# Altium PCB MiniDisplay.PcbDoc (part 2 of 2)
Units mil, origin at the board's own origin, x right, y up, seen from the top; angles counter-clockwise.
Board outline 1645.04 x 1210.04 mil, 2 copper layers (Top1, Bottom2), stack 42.17 mil thick; 71 components, 72 nets, 363 pads, 233 vias.
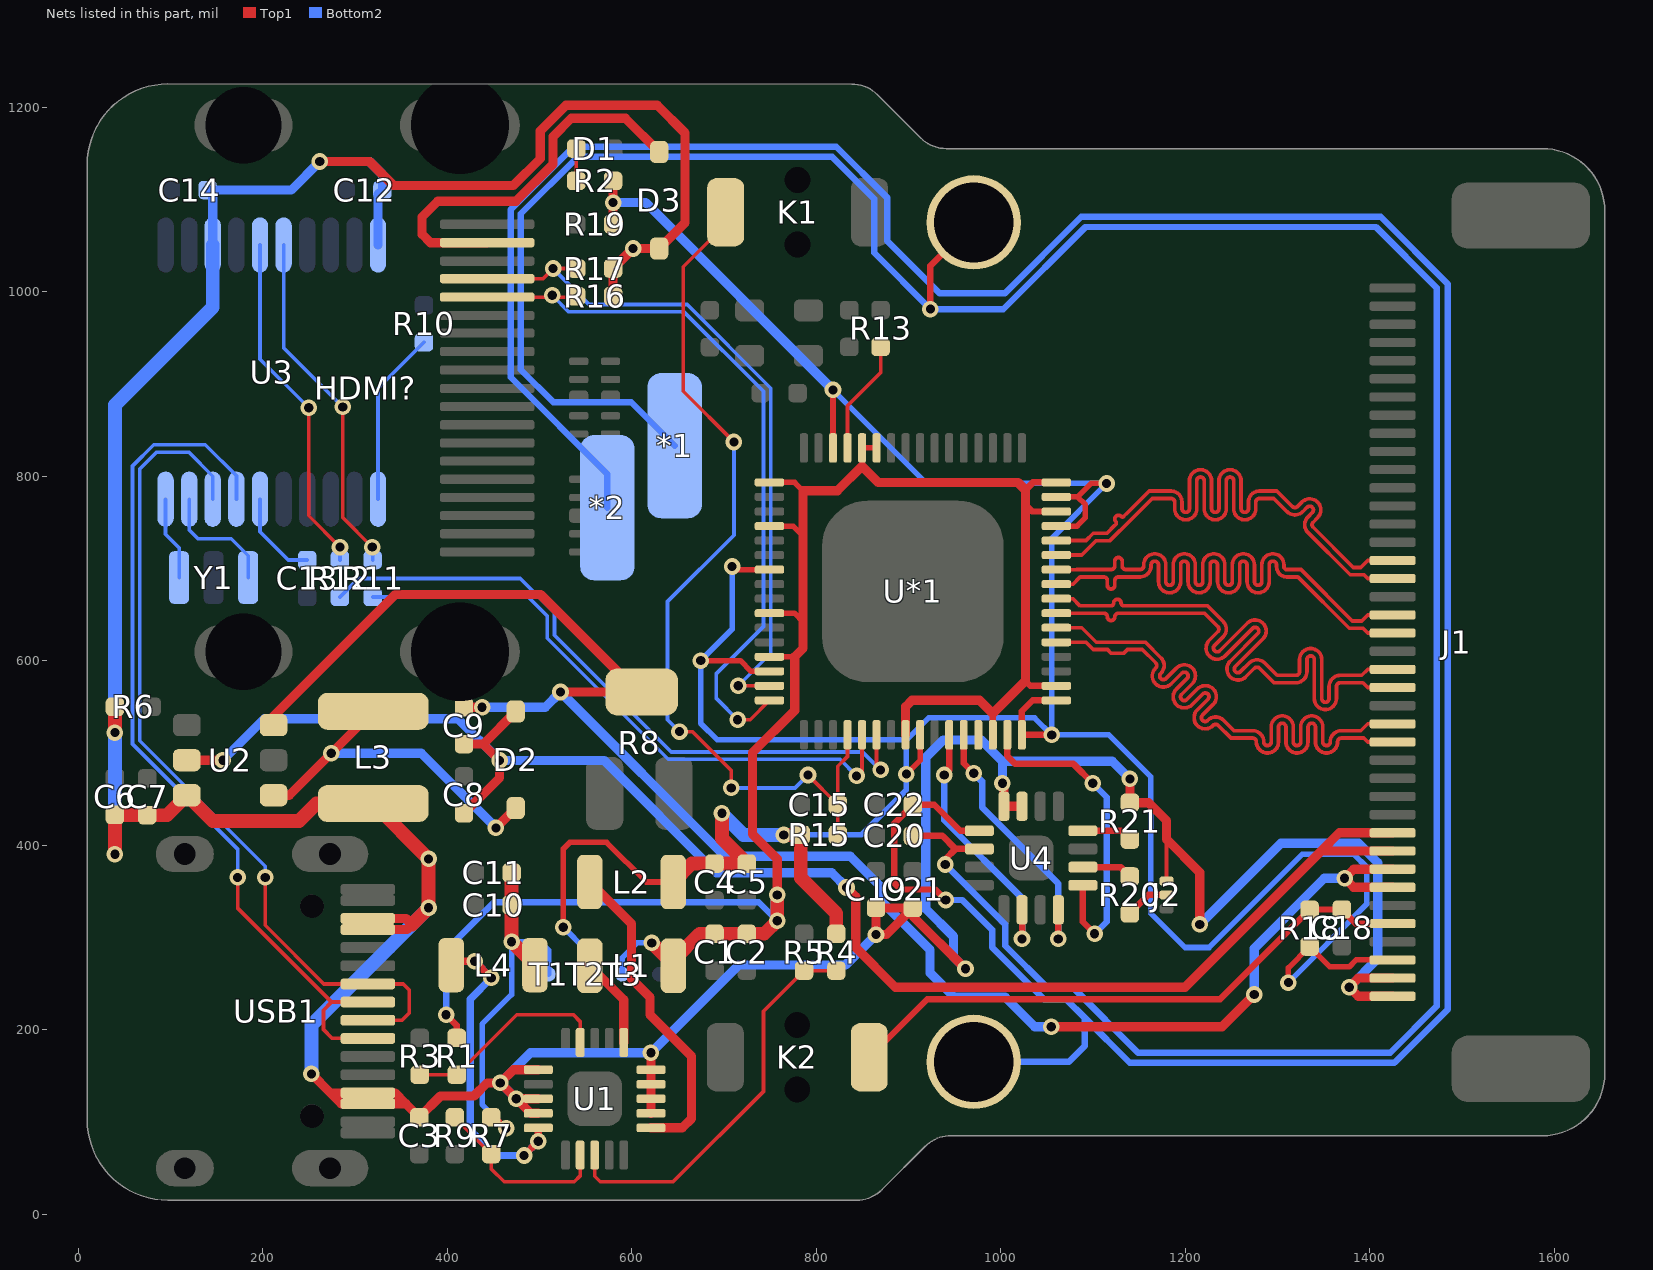
[diagram p2: the nets of this part, all layers, seen from the top]

## Via types
v1: diameter 18, hole 10, Top1 to Bottom2, tented both sides, 233 vias

## Nets (pads, with @x,y where several pads share a name; then routed paths per layer and width w, separated by ;. In a path a pad name is that pad's centre, name@x,y a point inside that pad or via, vN(x,y) a via of type N, cw(c..) or ccw(c..) an arc to the next point about the centre after c; other vN are vias at no path point) (continued)
MIPI1_D1_N: J1.16 U*1.38 | length 653.5
  Top1 w4: U*1.38@1060.51,635.63 1088.16,635.63 1103.84,619.94 1157.06,619.94 1173.78,603.22 cw(c1165.3,594.73) 1177.3,594.73 cw(c1165.3,594.73) 1173.78,586.25 ; 1173.69,586.15 ccw(c1176.52,583.32) 1173.69,580.5 ccw(c1176.52,583.32) 1179.35,580.5 1190.85,592 cw(c1199.33,583.51) 1207.82,592 cw(c1199.33,583.51) 1211.33,583.51 cw(c1199.33,583.51) 1207.82,575.03 1196.32,563.53 ccw(c1199.15,560.7) 1196.32,557.87 ccw(c1199.15,560.7) 1201.97,557.87 1213.47,569.37 cw(c1221.96,560.88) 1230.44,569.37 cw(c1221.96,560.88) 1233.96,560.88 cw(c1221.96,560.88) 1230.44,552.4 1218.94,540.9 ccw(c1221.77,538.07) 1218.94,535.24 ccw(c1221.77,538.07) 1224.59,535.23 ; 1224.69,535.33 cw(c1233.18,526.85) 1241.67,535.33 1253,524 1273.34,524 cw(c1273.34,512) 1285.34,512 ; 1285.34,511.87 ccw(c1289.34,511.87) 1293.34,511.87 1293.34,528.13 cw(c1305.34,528.13) 1317.34,528.13 1317.34,511.87 ccw(c1321.34,511.87) 1325.34,511.87 1325.34,528.13 cw(c1337.34,528.13) 1349.34,528.13 1349.34,511.87 ccw(c1353.34,511.87) 1357.34,511.87 ; 1357.34,512 cw(c1369.34,512) 1369.34,524 1390.58,524 1398,531.42 J1.16@1425,531.42
MIPI1_D1_P: J1.15 U*1.37 | length 652.4
  Top1 w4: U*1.37@1060.51,619.88 1092.59,619.88 1100.53,611.94 1115.86,611.94 1120,607.8 1133.4,607.8 1137.54,611.94 1153.74,611.94 1168.13,597.56 cw(c1165.3,594.73) 1169.3,594.73 cw(c1165.3,594.73) 1168.13,591.9 ; 1168.03,591.81 ccw(c1176.52,583.32) 1168.03,574.84 ccw(c1176.52,583.32) 1185,574.84 1196.5,586.34 cw(c1199.33,583.51) 1202.16,586.34 cw(c1199.33,583.51) 1203.33,583.51 cw(c1199.33,583.51) 1202.16,580.68 1190.66,569.18 ccw(c1199.15,560.7) 1190.66,552.21 ccw(c1199.15,560.7) 1207.63,552.21 1219.13,563.71 cw(c1221.96,560.88) 1224.79,563.71 cw(c1221.96,560.88) 1225.96,560.88 cw(c1221.96,560.88) 1224.79,558.06 1213.29,546.55 ccw(c1221.77,538.07) 1213.29,529.58 ccw(c1221.77,538.07) 1230.26,529.58 ; 1230.37,529.69 cw(c1233.18,526.85) 1236.01,529.68 1249.69,516 1273.34,516 cw(c1273.34,512) 1277.34,512 ; 1277.34,511.87 ccw(c1289.34,511.87) 1301.34,511.87 1301.34,528.13 cw(c1305.34,528.13) 1309.34,528.13 1309.34,511.87 ccw(c1321.34,511.87) 1333.34,511.87 1333.34,528.13 cw(c1337.34,528.13) 1341.34,528.13 1341.34,511.87 ccw(c1353.34,511.87) 1365.34,511.87 ; 1365.34,512 cw(c1369.34,512) 1369.34,516 1393.73,516 1398,511.73 J1.15@1425,511.73
MIPI1_D2_N: J1.22 U*1.42 | length 649.7
  Top1 w4: U*1.42@1060.51,698.62 1082.89,698.62 1082.95,698.69 1103.84,698.69 1107.84,698.69 1115.84,698.69 1119.84,698.69 ccw(c1119.84,702.69) 1123.84,702.69 1123.84,707.82 cw(c1127.84,707.82) 1127.84,711.82 cw(c1127.84,707.82) 1131.84,707.82 1131.84,702.69 ccw(c1135.84,702.69) 1135.84,698.69 1139.84,698.69 1145,698.69 1151.2,698.69 ccw(c1151.2,702.69) 1155.2,702.69 1155.2,703.82 cw(c1167.2,703.82) 1179.2,703.82 1179.2,685.55 ccw(c1183.2,685.55) 1187.2,685.55 1187.2,703.82 cw(c1199.2,703.82) 1211.2,703.82 1211.2,685.55 ccw(c1215.2,685.55) 1219.2,685.55 1219.2,703.82 cw(c1231.2,703.82) 1243.2,703.82 1243.2,685.55 ccw(c1247.2,685.55) 1251.2,685.55 1251.2,703.82 cw(c1263.2,703.82) 1275.2,703.82 1275.2,685.55 ccw(c1279.2,685.55) 1283.2,685.55 1283.2,703.82 cw(c1295.2,703.82) 1307.2,703.82 1307.2,701.89 ccw(c1310.4,701.89) 1310.4,698.69 1325.63,698.69 1381.31,643 1391.47,643 1398,649.53 J1.22@1425,649.53
MIPI1_D2_P: J1.21 U*1.41 | length 652.4
  Top1 w4: U*1.41@1060.51,682.87 1078.46,682.87 1086.27,690.69 1103.84,690.69 1107.84,690.69 1111.84,690.69 cw(c1111.84,686.69) 1115.84,686.69 1115.84,681.55 ccw(c1119.84,681.55) 1119.84,677.55 ccw(c1119.84,681.55) 1123.84,681.55 1123.84,686.69 cw(c1127.84,686.69) 1127.84,690.69 1131.84,690.69 1137,690.69 1151.2,690.69 ccw(c1151.2,702.69) 1163.2,702.69 1163.2,703.82 cw(c1167.2,703.82) 1171.2,703.82 1171.2,685.55 ccw(c1183.2,685.55) 1195.2,685.55 1195.2,703.82 cw(c1199.2,703.82) 1203.2,703.82 1203.2,685.55 ccw(c1215.2,685.55) 1227.2,685.55 1227.2,703.82 cw(c1231.2,703.82) 1235.2,703.82 1235.2,685.55 ccw(c1247.2,685.55) 1259.2,685.55 1259.2,703.82 cw(c1263.2,703.82) 1267.2,703.82 1267.2,685.55 ccw(c1279.2,685.55) 1291.2,685.55 1291.2,703.82 cw(c1295.2,703.82) 1299.2,703.82 1299.2,701.89 ccw(c1310.4,701.89) 1310.4,690.69 1322.31,690.69 1378,635 1392.84,635 1398,629.84 J1.21@1425,629.84
MIPI1_D3_N: J1.25 U*1.44 | length 653
  Top1 w4: U*1.44@1060.51,730.12 1092.59,730.12 1100.53,738.06 1115.34,738.06 1123.64,746.36 1124.96,747.68 ccw(c1123.46,749.19) 1124.96,750.69 cw(c1127.79,753.52) 1124.96,756.35 cw(c1127.79,753.52) 1130.62,756.35 ccw(c1132.13,757.86) 1133.64,756.35 1137.79,760.5 1141.74,764.46 1161.09,783.8 1184.74,783.8 cw(c1184.74,771.8) 1196.74,771.8 1196.74,764.67 ccw(c1200.74,764.67) 1204.74,764.67 1204.74,794.93 cw(c1216.74,794.93) 1228.74,794.93 1228.74,764.67 ccw(c1232.74,764.67) 1236.74,764.67 1236.74,794.93 cw(c1248.74,794.93) 1260.74,794.93 1260.74,764.67 ccw(c1264.74,764.67) 1268.74,764.67 1268.74,771.8 cw(c1280.74,771.8) 1280.74,783.8 1299.51,783.8 1316.24,767.07 ccw(c1319.07,769.9) 1321.9,767.07 1326.67,771.85 cw(c1335.16,763.36) 1347.16,763.36 cw(c1335.16,763.36) 1343.64,754.88 1338.87,750.1 ccw(c1341.7,747.27) 1338.85,744.46 1382.31,701 1390.42,701 1398,708.58 J1.25@1425,708.58
MIPI1_D3_P: J1.24 U*1.43 | length 647.8
  Top1 w4: U*1.43@1060.51,714.37 1088.16,714.37 1103.84,730.06 1118.66,730.06 1141.6,753 1164.4,775.8 1184.74,775.8 cw(c1184.74,771.8) 1188.74,771.8 1188.74,764.67 ccw(c1200.74,764.67) 1212.74,764.67 1212.74,794.93 cw(c1216.74,794.93) 1220.74,794.93 1220.74,764.67 ccw(c1232.74,764.67) 1244.74,764.67 1244.74,794.93 cw(c1248.74,794.93) 1252.74,794.93 1252.74,764.67 ccw(c1264.74,764.67) 1276.74,764.67 1276.74,771.8 cw(c1280.74,771.8) 1280.74,775.8 1296.2,775.8 1310.58,761.42 ccw(c1319.07,769.9) 1327.56,761.42 1332.33,766.19 cw(c1335.16,763.36) 1339.16,763.36 cw(c1335.16,763.36) 1337.99,760.53 1333.21,755.76 ccw(c1341.7,747.27) 1333.21,738.79 1379,693 1393.9,693 1398,688.9 J1.24@1425,688.9
MIPI1_DC_N: J1.19 U*1.40 | length 653
  Top1 w4: U*1.40@1060.51,667.13 1078.46,667.13 1086.27,659.32 1118.66,659.32 1119.52,659.32 ccw(c1119.52,662.45) 1122.66,662.45 cw(c1126.66,662.45) 1126.66,666.45 cw(c1126.66,662.45) 1130.66,662.45 ccw(c1133.79,662.45) 1133.79,659.32 1138.66,659.32 1143,659.32 1224.49,659.32 1241.21,642.59 cw(c1232.73,634.1) 1244.73,634.1 cw(c1232.73,634.1) 1241.21,625.62 1231.93,616.33 ccw(c1234.76,613.5) 1237.58,610.67 1267.47,640.56 cw(c1275.95,632.07) 1287.95,632.07 cw(c1275.95,632.07) 1284.44,623.59 1254.55,593.7 ccw(c1257.38,590.87) 1260.21,588.05 1269.5,597.33 cw(c1277.98,588.85) 1286.47,597.33 1299.8,584 1320.14,584 ccw(c1320.14,588) 1324.14,588 1324.14,601.13 cw(c1336.14,601.13) 1348.14,601.13 1348.14,558.87 ccw(c1352.14,558.87) 1356.14,558.87 1356.14,572 cw(c1368.14,572) 1368.14,584 1391.53,584 1398,590.47 J1.19@1425,590.47
MIPI1_DC_P: J1.18 U*1.39 | length 650.2
  Top1 w4: U*1.39@1060.51,651.38 1082.89,651.38 1082.95,651.32 1103.84,651.32 1107.84,651.32 1111.93,651.32 cw(c1111.93,647.4) 1115.84,647.4 ccw(c1119.84,647.4) 1119.84,643.4 ccw(c1119.84,647.4) 1123.84,647.4 cw(c1127.76,647.4) 1127.76,651.32 1131.84,651.32 1137.6,651.32 1221.17,651.32 1235.56,636.93 cw(c1232.73,634.1) 1236.73,634.1 cw(c1232.73,634.1) 1235.56,631.27 1226.27,621.99 ccw(c1234.76,613.5) 1243.24,605.02 1273.13,634.9 cw(c1275.95,632.07) 1279.95,632.07 cw(c1275.95,632.07) 1278.78,629.25 1248.9,599.36 ccw(c1257.38,590.87) 1265.87,582.39 1275.15,591.68 cw(c1277.98,588.85) 1280.81,591.68 1296.49,576 1320.14,576 ccw(c1320.14,588) 1332.14,588 1332.14,601.13 cw(c1336.14,601.13) 1340.14,601.13 1340.14,558.87 ccw(c1352.14,558.87) 1364.14,558.87 1364.14,572 cw(c1368.14,572) 1368.14,576 1392.79,576 1398,570.79 J1.18@1425,570.79
Net*1_1: *1.1 C20.1 pad.@971,1075 U4.10 | length 3198.4
  Top1 w7: C20.1@905,410 937,410 951.16,395.84 ; v1(924,981) 924,1028 pad.@971,1075 ; v1(940,379) 940,384.69 951.16,395.84 ; U4.10@977.03,395.84 951.16,395.84
  Bottom2 w7: *1.1@646.75,832.97 599.72,880 515.39,880 480,915.39 480,1084.44 541.56,1146 817.44,1146 863,1100.44 863,1042 v1(924,981) 1003,981 1092,1070 1407,1070 1473,1004 1473,225.56 1422.44,175 1149,175 1079,245 1051,245 1005,291 1005,314 v1(940,379)
Net*2_1: *2.1 C22.1 pad.@971,165 U4.9 | length 3405.3
  Top1 w7: v1(940.5,340.5) 929.11,351.89 892.11,351.89 885,359 885,423.8 C22.1@905,443.8 928.2,443.8 956.47,415.53 U4.9@977.03,415.53
  Bottom2 w7: *2.1@573.9,765.8 573.9,802.1 469,907 469,1089 537,1157 822,1157 877,1102 877,1055 934,998 1004.44,998 1087.44,1081 1412,1081 1485,1008 1485,222 1427,164 1140,164 1091.5,212.5 ; v1(940.5,340.5) 958.5,340.5 991,308 991,289 1047,233 1071,233 1091.5,212.5 ; pad.@971,165 1074,165 1091.5,182.5 1091.5,212.5
NetC13_1: C13.1 U3.6 | length 99.1
  Bottom2 w4: U3.6@197.28,775 197.28,739.72 228,709 C13.1@248.4,709
NetC18_2: C18.2 J1.5 K2.1 R18.1 | length 640
  Top1 w7: K2.1@857.69,170 920.69,233 1238,233 R18.1@1335,330 1335.2,330.2 C18.2@1370,330.2 1385.31,314.88 J1.5@1425,314.88
NetD1_1: D1.1 R2.2 | length 35
  Top1 w4: R2.2@540,1120 D1.1@540,1155
NetD2_1: D2.1 L3.2 U2.1 | length 388
  Top1 w10: U2.1@212,454.05 229.05,454.05 v1(274.52,499.52) L3.2@320,545 ; v1(453,418.66) D2.1@474.5,440.16
  Bottom2 w10: v1(274.52,499.52) 372.14,499.52 v1(453,418.66)
NetD3_1: D3.1 HDMI?.18 | length 427.2
  Top1 w10: HDMI?.18@443.5,1053 382,1053 373,1062 373,1081 390,1098 474.67,1098 515,1138.33 515,1168.2 534.8,1188 593.34,1188 D3.1@630,1151.34
NetJ2_2: J2.2 R20.1 | length 48.1
  Top1 w7: R20.1@1140.23,326 1160.23,346 J2.2@1180,346
NetL1_1: L1.1 U1.11 | length 98.4
  Top1 w10: L1.1@554.72,269.21 591.5,232.44 U1.11@591.5,186.02
NetL2_1: L2.1 U1.6 | length 350.3
  Top1 w10: L2.1@554.72,360 600,314.72 600,255 620,235 620,216.02 665,171.02 665,103.5 655,93.5 U1.6@621.02,93.5
NetL4_1: L4.1 U1.20 | length 380.6
  Top1 w8: L4.1@404.72,270 408.72,274 v1(430,274) v1(448,256) ; v1(483.5,63.5) v1(498.98,78.98) U1.20@498.98,93.5
  Bottom2 w8: v1(430,274) v1(448,256) 425,233 425,91 452.5,63.5 v1(483.5,63.5) v1(498.98,78.98)
NetR1_1: R1.1 R3.2 U1.14 | length 226.4
  Top1 w4: R3.2@370.5,151.02 R1.1@410.5,151.02 475.48,216 537,216 544.25,208.75 U1.14@544.25,186.02
NetR4_1: R4.1 R5.2 U1.3 | length 433.2
  Top1 w4: U1.3@560,63.98 560,41 566,35 645,35 743,133 743,219.9 R5.2@787,263.9 R4.1@822,263.9
NetR7_1: R7.1 R9.2 U1.2 | length 199.7
  Top1 w4: R9.2@408.5,105 408.5,104.5 R7.1@448,65 448,49 462,35 538,35 544.25,41.25 U1.2@544.25,63.98
NetR10_2: R10.2 U3.1 | length 190.6
  Bottom2 w4: U3.1@325.23,775 325.23,895.23 R10.2@375,945
NetR11_1: R11.1 U3.16 | length 381.6
  Top1 w4: v1(287,875) 287,755 v1(319,723)
  Bottom2 w4: U3.16@222.87,1050.59 222.87,939.13 v1(287,875) ; v1(319,723) 319.4,722.6 R11.1@319.4,709
NetR12_1: R12.1 U3.15 | length 377.5
  Top1 w4: v1(250,874) 250,757 v1(284,723)
  Bottom2 w4: U3.15@197.28,1050.59 197.28,926.72 v1(250,874) ; R12.1@283.9,709 283.9,722.9 v1(284,723)
NetR13_2: R13.2 U*1.61 | length 124.3
  Top1 w4: U*1.61@834.13,830.51 834.13,876.13 870,912 R13.2@870,940
NetR20_2: R20.2 U4.2 | length 55.2
  Top1 w7: U4.2@1089.23,376.16 1130.07,376.16 R20.2@1140.23,366
NetR21_2: R21.2 U4.4 | length 54.9
  Top1 w7: U4.4@1089.23,415.53 1130.7,415.53 R21.2@1140.23,406
NetU3_9: U3.9 Y1.3 | length 132.5
  Bottom2 w4: U3.9@120.51,775 120.51,741.49 130,732 166,732 184.4,713.6 Y1.3@184.4,690
NetU3_10: U3.10 Y1.1 | length 91.1
  Bottom2 w4: U3.10@94.92,775 94.92,737.08 109.6,722.4 Y1.1@109.6,690
NetU4_1: U4.1 U*1.31 | length 360.1
  Top1 w7: U*1.31@1007.36,519.49 1007.36,496.64 1016,488 1079,488 v1(1100,467) ; U4.1@1089.23,356.47 1089.23,316.77 v1(1102,304)
  Bottom2 w7: v1(1100,467) 1115,452 1115,317 v1(1102,304)
NetU4_14: U4.14 U*1.27 | length 289.9
  Top1 w7: v1(939,476) 944.37,481.37 U*1.27@944.37,519.49 ; v1(1023.29,298.29) U4.14@1023.29,329.9
  Bottom2 w7: v1(939,476) 939,427 1023.29,342.71 v1(1023.29,298.29)
NetU4_16: U4.16 U*1.28 | length 295.3
  Top1 w7: U*1.28@960.12,519.49 960.12,488.88 v1(971,478) ; v1(1062.66,298.29) U4.16@1062.66,329.9
  Bottom2 w7: v1(971,478) 980,469 980,441 1062.66,358.34 v1(1062.66,298.29)
NetU*1_29: U*1.29
PHY_RST: C15.2 K1.2 R15.1 U*1.20 | length 979.9
  Top1 w4: v1(652,523) 666,523 708,481 v1(708,462) ; K1.2@702,1086 702,1073 656,1027 656,892 v1(711,837) ; v1(791.3,476) C15.2@823.5,443.8 ; R15.1@823.5,411.12 C15.2@823.5,443.8 ; U*1.20@834.13,519.49 834.13,496.13 823.5,485.5 C15.2@823.5,443.8
  Bottom2 w4: v1(652,523) 639,536 639,664 711,736 v1(711,837) ; v1(708,462) 777.3,462 v1(791.3,476)
R_DDC_SCL: HDMI?.15 R16.1 U*1.16 | length 798.8
  Top1 w4: HDMI?.15@443.5,994 539,994 R16.1@540,995 ; v1(715,536) 728.6,536 U*1.16@749.49,556.89
  Bottom2 w4: v1(514,996) 532,978 657,978 743,892 743,637 692,586 692,559 v1(715,536)
R_DDC_SDA: HDMI?.16 R17.1 U*1.15 | length 761.9
  Top1 w4: HDMI?.16@443.5,1014 504,1014 v1(515,1025) R17.1@540,1025 ; v1(715.64,572.64) U*1.15@749.49,572.64
  Bottom2 w4: v1(515,1025) 554,986 660.31,986 751,895.31 751,608 v1(715.64,572.64)
R_I2C_SCL: R11.2 U*1.21 | length 666.1
  Top1 w4: v1(844,475) 849.88,480.88 U*1.21@849.88,519.49
  Bottom2 w4: R11.2@319.4,669 488,669 508.56,648.44 508.56,624.13 639.69,493 826,493 v1(844,475)
R_I2C_SDA: R12.2 U*1.22 | length 734.4
  Top1 w4: U*1.22@865.63,519.49 865.63,485.87 v1(870,481.5)
  Bottom2 w4: R12.2@283.9,669 303.9,689 479.31,689 516.56,651.75 516.56,627.44 643,501 850.5,501 v1(870,481.5)
UD+: U3.7 USB1.A6 USB1.B6 | length 957.1
  Top1 w4: v1(173,365) 173,331.69 274.84,229.84 ; USB1.B6@314.21,190.47 275.53,190.47 266,200 266,221 274.84,229.84 ; USB1.A6@314.21,229.84 274.84,229.84
  Bottom2 w4: U3.7@171.69,775 171.69,800.31 138,834 82,834 59,811 59,509.69 173,395.69 v1(173,365)
UD-: U3.8 USB1.A7 USB1.B7 | length 931.5
  Top1 w4: v1(203,365) 203,313 266.47,249.53 USB1.B7@314.21,249.53 352.47,249.53 359,243 359,218 351.16,210.16 USB1.A7@314.21,210.16
  Bottom2 w4: U3.8@146.1,775 146.1,799.9 120,826 85.31,826 67,807.69 67,513 203,377 v1(203,365)
VCC_1V2: C1.1 C2.1 L1.2 R1.2 T3.0 U*1.1 U*1.4 U*1.10 U*1.13 U*1.24 U*1.30 U*1.34 U*1.46 U*1.48 U*1.59 U*1.60 | length 2213
  Top1 w6: U*1.13@749.49,604.13 776.82,604.13 ; U*1.10@749.49,651.38 776.62,651.38 786,642 ; U*1.4@749.49,745.87 775.13,745.87 786,735 ; U*1.1@749.49,793.11 776.89,793.11 786,784 ; 849.88,810.75 U*1.60@849.88,830.51 U*1.59@865.63,830.51
  Top1 w7: v1(399,216) 410.5,204.5 R1.2@410.5,191.02 ; U*1.30@991.61,519.49 991.61,542.61 ; 1027,578 1032.36,572.64 U*1.34@1060.51,572.64 ; 1027,769 1034.39,761.61 U*1.46@1060.51,761.61 ; 1027,785 1035.11,793.11 U*1.48@1060.51,793.11
  Top1 w10: v1(758,346) 758,385 731,412 731,500 777,546 777,603.95 ; 776.82,604.13 786,613.32 786,642 786,735 786,784 823.13,784 849.88,810.75 867.52,793.11 1018.89,793.11 1027,785 1027,769 1027,578 991.61,542.61 977.23,557 904,557 897.13,550.13 U*1.24@897.13,519.49
  Top1 w15: v1(622,294) L1.2@645.28,270.72 ; L1.2@645.28,269.21 L1.2@645.28,270.72 ; v1(758,346) v1(758,318) 743.9,303.9 C2.1@725,303.9 C1.1@690,303.9 673.9,303.9 645.28,275.28 L1.2@645.28,270.72
  Bottom2 w6: T3.0@590,260.01 590,278 606,294 v1(622,294)
  Bottom2 w7: v1(399,216) 399,286.02 450.98,338 738,338 v1(758,318)
  Bottom2 w15: v1(758,318) v1(758,346)
VCC_1V8: C10.1 C11.1 L4.2 R7.2 T1.0 | length 427.6
  Top1 w6: R7.2@448,105 452,105 v1(464,93)
  Top1 w15: C11.1@470,370 C10.1@470,335 v1(470,295.28) L4.2@495.28,270
  Bottom2 w6: v1(464,93) 438,119 438,206 470,238 v1(470,295.28) 500.72,295.28 510,286 T1.0@510,260
VCC_3V3: C4.1 C5.1 J1.3 L2.2 R2.1 R4.2 R15.2 R18.2 R19.1 T2.0 U*1.7 U*1.14 U*1.25 U*1.32 U*1.33 U*1.45 U*1.47 U*1.62 | length 3797.2
  Top1 w6: v1(526,311) 526,396 533,403 573,403 616,360 L2.2@645.28,360 ; v1(675,600) 718,600 729.61,588.39 U*1.14@749.49,588.39 ; v1(709,702) 712.38,698.62 U*1.7@749.49,698.62 ; U*1.62@818.39,830.51 v1(818.39,893.39) ; v1(898,477) 912.87,491.87 U*1.25@912.87,519.49 ; U*1.45@1060.51,745.87 1082.87,745.87 1092,755 1092,769 1083.64,777.36 ; U*1.47@1060.51,777.36 1083.64,777.36 ; v1(1115,792) 1098.28,792 1083.64,777.36 ; v1(1312,251) 1312,267 R18.2@1335,290 1357,268 1378,268 1385.51,275.51 J1.3@1425,275.51
  Top1 w7: v1(1055.51,519.49) U*1.32@1023.11,519.49 1023.11,545.11 1034.89,556.89 U*1.33@1060.51,556.89
  Top1 w10: R19.1@580,1073 v1(580,1096.5) R2.1@580,1120
  Top1 w15: L2.2@645.28,360 665.28,380 C4.1@690,380 C5.1@725,380 698,407 v1(698,434.5) ; v1(765,411) 783.38,411 R15.2@783.5,411.12 783.5,364.39 822,325.89 R4.2@822,303.9
  Bottom2 w6: v1(526,311) 550,287 T2.0@550,260.01 ; v1(709,702) 709,634 v1(675,600) 675,532 693,514 898,514 ; v1(765,411) 849,411 898,460 v1(898,477) 898,514 ; v1(818.39,893.39) 919.77,792 v1(1115,792) 1055.51,732.51 v1(1055.51,519.49) ; v1(1312,251) 1397,336 1397,376 1383,390 1327,390 1226,289 1200,289 1163,326 1163,474 1117.51,519.49 v1(1055.51,519.49) ; 898,514 922,538 1037,538 v1(1055.51,519.49)
  Bottom2 w10: v1(580,1096.5) 615.27,1096.5 v1(818.39,893.39)
  Bottom2 w15: v1(698,434.5) 721.5,411 v1(765,411)
VCC_5V: C3.2 C6.2 C7.2 C12.1 C14.1 C19.2 C21.2 D3.2 J1.1 J1.2 J2.3 L3.1 R6.2 R16.2 R17.2 R21.1 U1.7 U1.8 U1.9 U1.10 U1.16 U1.18 U1.19 U2.6 U3.13 U3.20 U4.7 U4.8 USB1.A4 USB1.A9 USB1.B4 USB1.B9 | length 5150.7
  Top1 w4: J2.3@1180,361 1180,406.23
  Top1 w10: v1(253,152) 273.58,131.42 ; v1(262,1141) 316,1141 342,1115 471.87,1115 501,1144.13 501,1174 529,1202 628,1202 658,1172 658,1074.66 D3.2@630,1046.66 v1(601.66,1046.66) R17.2@580,1025 R16.2@580,995 ; USB1.B9@314.21,308.58 356.58,308.58 362,314 355.61,320.39 USB1.A4@314.21,320.39 ; U1.19@498.98,109.25 490.75,109.25 v1(475,125) ; U1.18@498.98,125 v1(475,125) ; U1.16@498.98,156.5 471.99,156.5 v1(457.75,142.25) ; U1.7@621.02,109.25 U1.8@621.02,125 U1.9@621.02,140.75 U1.10@621.02,156.5 v1(621.02,174.98) ; v1(962,266) 905,323 C21.2@905,331.89 ; v1(1002,467) 1003.6,465.4 U4.8@1003.6,442.1 U4.7@1023.29,442.1 ; v1(1140.23,471.77) R21.1@1140.23,446 1160.36,446 1180,426.36 1180,406.23 1216,370.23 v1(1216,314) ; J1.1@1425,236.14 1387.86,236.14 v1(1378,246) 1387.83,255.83 J1.2@1425,255.83 ; 273.58,131.42 285.39,119.61 USB1.A9@314.21,119.61 355.39,119.61 ; 273.58,131.42 USB1.B4@314.21,131.42 343.58,131.42 355.39,119.61 ; 355.39,119.61 C3.2@370,105 393,128 429.25,128 443.5,142.25 v1(457.75,142.25) ; v1(457.75,142.25) v1(475,125) ; C21.2@905,331.89 876.11,303 v1(865,303) C19.2@865,331.89 C21.2@905,331.89
  Top1 w15: v1(40,390) C6.2@40,432.68 74.69,432.68 C7.2@75,432.36 96.32,432.36 U2.6@118,454.05 146.05,426 239.5,426 258.5,445 L3.1@320,445 v1(380,385) v1(380,332) 362,314 ; v1(40,522) R6.2@40,550
  Bottom2 w10: U3.13@146.1,1050.59 146.1,1104.41 C14.1@140.51,1110 231,1110 v1(262,1141) 316,1141 330,1127 C12.1@330,1110 325.23,1105.23 U3.20@325.23,1050.59 ; v1(475,125) v1(457.75,142.25) 490.47,174.98 v1(621.02,174.98) 716.05,270 832,270 v1(865,303) ; v1(962,266) 949.1,278.9 949.1,300.9 919,331 919,495.05 937.95,514 979,514 1002,491 ; v1(1002,467) 1002,491 ; v1(1140.23,471.77) 1121,491 1002,491 ; v1(1216,314) 1304,402 1387.97,402 1409,380.97 1409,277 v1(1378,246)
  Bottom2 w15: v1(40,390) v1(40,522) 40,877 146.1,983.1 U3.13@146.1,1050.59 ; v1(253,152) 253,205 v1(380,332)
VLED+: C8.2 C9.2 D2.2 J1.9 J1.10 U2.5 | length 1794.2
  Top1 w10: U2.5@118,492.05 v1(157.05,492.05) ; C8.2@418.38,434.5 457,473.12 v1(457,491.66) 439.16,509.5 ; C9.2@418.38,509.5 439.16,509.5 ; D2.2@474.5,544.84 439.16,509.5 ; v1(833,354) 843,344 843,289 886,246 1200,246 1347.62,393.62 ; J1.9@1425,393.62 1347.62,393.62 ; J1.10@1425,413.31 1367.31,413.31 1347.62,393.62
  Bottom2 w10: v1(157.05,492.05) 202,537 411.66,537 v1(457,491.66) 570.34,491.66 692,370 817,370 v1(833,354)
VLED-: C9.1 J1.7 J1.8 R8.3 U2.3 | length 1934.7
  Top1 w10: U2.3@212,530.05 212,540 343.72,671.72 501.28,671.72 R8.3@607,566 ; C9.1@418.38,549.5 v1(438,549.5) ; v1(523,566) R8.3@607,566 ; R8.3@611,566 R8.3@607,566 ; v1(1055,203) 1240,203 v1(1275,238) ; J1.7@1425,354.25 1382.75,354.25 v1(1373,364) 1382.94,373.94 J1.8@1425,373.94
  Bottom2 w10: v1(438,549.5) 506.5,549.5 v1(523,566) 701,388 837,388 869,356 869,341 923.5,286.5 923.5,261.5 950,235 1005,235 1037,203 v1(1055,203) ; v1(1275,238) 1275,288 1351,364 v1(1373,364)
pads on no net: HDMI?.13 HDMI?.14 HDMI?.17 K1.0 K2.0 R8.2 U3.2 U3.3 U3.4 U3.5 U3.14 U3.17 U3.18 U3.19 U4.5 U4.6 U4.12 U4.13 U*1.17 U*1.18 USB1.0 USB1.A5 USB1.A8 USB1.B5 USB1.B8

## Polygon pours and split planes (outlines as drawn)
GND on Bottom2 "Bottom2-GND" (solid, remove dead copper, pour order 0): -100,1300 1750,1300 1750,-50 -100,-50
GND on Top1 "Top1-GND" (solid, remove dead copper, pour order 4): -100,1300 1750,1300 1750,-50 -100,-50

## Keep-outs
Keep-Out Layer:
  the board outline again, w10

## Other copper
Top1:
  text "HDMI to MIPI" at 1041,1037 h65
Bottom2:
  text "WWW.PENGZHIHUI.COM" at 1508,407 h60 r270

## Silkscreen, mask and mechanical layers (free items; w line width, h text height)
Top Overlay:
  rectangle: 1045,123 1051,216
  region: 856.86,29.7 856.86,83 907.14,83
  region: 847.86,1210.3 847.86,1157 898.14,1157
  text "LT-RST" at 684,1167.5 h50
  text "Designed by" at 1070,190 h35
  text "Pengzhihui" at 1070,130 h70
  text "SC-RST" at 847.75,72 h50 r180
Bottom Overlay:
  lines w15: 500.75,310 500.75,960
  text "Speaker" at 613,628 h80 r90
  text "1.8V   3.3V   1.2V   GND" at 493,242 h16 r180
Top Solder:
  rectangle: 1040.96,1036 1410,1105.16
Bottom Solder:
  rectangle: 1506.28,406.2 1594,1077.2
Drill Drawing:
  circle w10: c105.62,2562.28 r33.33
  circle w10: c105.62,1962.28 r20
  circle w10: c105.62,1962.28 r33.33
  lines w10: 72.29,2145.61 138.96,2145.61 105.62,2078.94 72.29,2145.61 ; 72.29,2228.94 138.96,2228.94 138.96,2295.61 72.29,2295.61 72.29,2228.94 ; 72.29,2378.94 138.96,2378.94 138.96,2445.61 72.29,2445.61 72.29,2378.94 ; 72.29,2695.61 88.96,2695.61 88.96,2678.94 122.29,2678.94 122.29,2695.61 138.96,2695.61 138.96,2728.94 122.29,2728.94 122.29,2745.61 88.96,2745.61 88.96,2728.94 72.29,2728.94 72.29,2695.61 ; 72.29,2845.61 88.96,2845.61 105.62,2828.94 122.29,2845.61 138.96,2845.61 122.29,2862.28 138.96,2878.94 122.29,2878.94 105.62,2895.61 88.96,2878.94 72.29,2878.94 88.96,2862.28 72.29,2845.61 ; 72.29,2978.94 105.62,2995.61 138.96,2978.94 122.29,3012.28 138.96,3045.61 105.62,3028.94 72.29,3045.61 88.96,3012.28 72.29,2978.94 ; 85.62,2392.28 125.62,2392.28 125.62,2432.28 85.62,2432.28 85.62,2392.28
  lines w15: 12.5,1883.94 13310.76,1883.94 ; 12.5,3083.94 13310.76,3083.94 ; 563.38,1733.94 563.38,3233.94 ; 1163.22,1733.94 1163.22,3233.94 ; 2312.88,1733.94 2312.88,3233.94 ; 2818.76,1733.94 2818.76,3233.94 ; 3552.56,1733.94 3552.56,3233.94 ; 4742.21,1733.94 4742.21,3233.94 ; 5332.06,1733.94 5332.06,3233.94 ; 6077.86,1733.94 6077.86,3233.94 ; 7287.5,1733.94 7287.5,3233.94 ; 8141.27,1733.94 8141.27,3233.94 ; 9474.88,1733.94 9474.88,3233.94 ; 10808.48,1733.94 10808.48,3233.94 ; 11908.16,1733.94 11908.16,3233.94 ; 12.5,1733.94 13310.76,1733.94 13310.76,3233.94 12.5,3233.94 12.5,1733.94
  text "Symbol" at 102.5,3128.94 h72
  text "Count" at 608.38,3128.94 h72
  text "Hole Size" at 1208.22,3128.94 h72
  text "Plated" at 2357.88,3128.94 h72
  text "Hole Type" at 2863.76,3128.94 h72
  text "Drill Layer Pair" at 3597.56,3128.94 h72
  text "Via/Pad" at 4787.21,3128.94 h72
  text "Pad Shape" at 5377.06,3128.94 h72
  text "Template" at 6122.86,3128.94 h72
  text "Description" at 7332.5,3128.94 h72
  text "Hole Tolerance (+)" at 8186.27,3128.94 h72
  text "Hole Tolerance (-)" at 9519.88,3128.94 h72
  text "Hole Length" at 10853.48,3128.94 h72
  text "Routed Path Length" at 11953.16,3128.94 h72
  text "2" at 608.38,2978.94 h60
  text "23.62mil (0.600mm)" at 1208.22,2978.94 h60
  text "PTH" at 2357.88,2978.94 h60
  text "Slot" at 2863.76,2978.94 h60
  text "Top1 - Bottom2" at 3597.56,2978.94 h60
  text "Pad" at 4787.21,2978.94 h60
  text "Rounded" at 5377.06,2978.94 h60
  text "r160_100h60_120r100" at 6122.86,2978.94 h60
  text "47.24mil (1.200mm)" at 10853.48,2978.94 h60
  text "23.62mil (0.600mm)" at 11953.16,2978.94 h60
  text "2" at 608.38,2828.94 h60
  text "23.62mil (0.600mm)" at 1208.22,2828.94 h60
  text "PTH" at 2357.88,2828.94 h60
  text "Slot" at 2863.76,2828.94 h60
  text "Top1 - Bottom2" at 3597.56,2828.94 h60
  text "Pad" at 4787.21,2828.94 h60
  text "Rounded" at 5377.06,2828.94 h60
  text "r210_100h60_170r100" at 6122.86,2828.94 h60
  text "66.93mil (1.700mm)" at 10853.48,2828.94 h60
  text "43.31mil (1.100mm)" at 11953.16,2828.94 h60
  text "2" at 608.38,2678.94 h60
  text "25.59mil (0.650mm)" at 1208.22,2678.94 h60
  text "PTH" at 2357.88,2678.94 h60
  text "Round" at 2863.76,2678.94 h60
  text "Top1 - Bottom2" at 3597.56,2678.94 h60
  text "Pad" at 4787.21,2678.94 h60
  text "Rounded" at 5377.06,2678.94 h60
  text "c65h65" at 6122.86,2678.94 h60
  text "-" at 10853.48,2678.94 h60
  text "-" at 11953.16,2678.94 h60
  text "2" at 608.38,2528.94 h60
  text "82.68mil (2.100mm)" at 1208.22,2528.94 h60
  text "PTH" at 2357.88,2528.94 h60
  text "Slot" at 2863.76,2528.94 h60
  text "Top1 - Bottom2" at 3597.56,2528.94 h60
  text "Pad" at 4787.21,2528.94 h60
  text "Rounded" at 5377.06,2528.94 h60
  text "r150_270h210_90r100" at 6122.86,2528.94 h60
  text "35.43mil (0.900mm)" at 10853.48,2528.94 h60
  text "-47.24mil (-1.200mm)" at 11953.16,2528.94 h60
  text "2" at 608.38,2378.94 h60
  text "86.61mil (2.200mm)" at 1208.22,2378.94 h60
  text "PTH" at 2357.88,2378.94 h60
  text "Round" at 2863.76,2378.94 h60
  text "Top1 - Bottom2" at 3597.56,2378.94 h60
  text "Pad" at 4787.21,2378.94 h60
  text "Rounded" at 5377.06,2378.94 h60
  text "c260h220" at 6122.86,2378.94 h60
  text "-" at 10853.48,2378.94 h60
  text "-" at 11953.16,2378.94 h60
  text "2" at 608.38,2228.94 h60
  text "106.30mil (2.700mm)" at 1208.22,2228.94 h60
  text "PTH" at 2357.88,2228.94 h60
  text "Slot" at 2863.76,2228.94 h60
  text "Top1 - Bottom2" at 3597.56,2228.94 h60
  text "Pad" at 4787.21,2228.94 h60
  text "Rounded" at 5377.06,2228.94 h60
  text "r150_330h270_90r100" at 6122.86,2228.94 h60
  text "35.43mil (0.900mm)" at 10853.48,2228.94 h60
  text "-70.87mil (-1.800mm)" at 11953.16,2228.94 h60
  text "4" at 608.38,2078.94 h60
  text "28.00mil (0.711mm)" at 1208.22,2078.94 h60
  text "PTH" at 2357.88,2078.94 h60
  text "Round" at 2863.76,2078.94 h60
  text "Top1 - Bottom2" at 3597.56,2078.94 h60
  text "Pad" at 4787.21,2078.94 h60
  text "Rounded" at 5377.06,2078.94 h60
  text "c0h71" at 6122.86,2078.94 h60
  text "-" at 10853.48,2078.94 h60
  text "-" at 11953.16,2078.94 h60
  text "233" at 608.38,1928.94 h60
  text "10.00mil (0.254mm)" at 1208.22,1928.94 h60
  text "PTH" at 2357.88,1928.94 h60
  text "Round" at 2863.76,1928.94 h60
  text "Top1 - Bottom2" at 3597.56,1928.94 h60
  text "Via" at 4787.21,1928.94 h60
  text "Rounded" at 5377.06,1928.94 h60
  text "v46h25m0mx0" at 6122.86,1928.94 h60
  text "-" at 10853.48,1928.94 h60
  text "-" at 11953.16,1928.94 h60
  text "249 Total" at 608.38,1778.94 h60
  text "Slot definitions :" at 102.5,1633.97 h60
  text "Routed Path Length" at 1135.19,1633.97 h60
  text "= Calculated from tool start centre position to tool end centre position." at 2237.86,1633.97 h60
  text "Hole Length" at 1135.19,1533.99 h60
  text "= Routed Path Length + Tool Size = Slot length as defined in the PCB layout" at 1827.99,1533.99 h60